# Altium PCB PCB_Internal Battery charger.PcbDoc
Units mm, origin at the board's own origin, x right, y up, seen from the top; angles counter-clockwise.
Board outline 12 x 18 mm, 2 copper layers (Top Layer, Bottom Layer); 22 components, 20 nets, 82 pads, 50 vias.
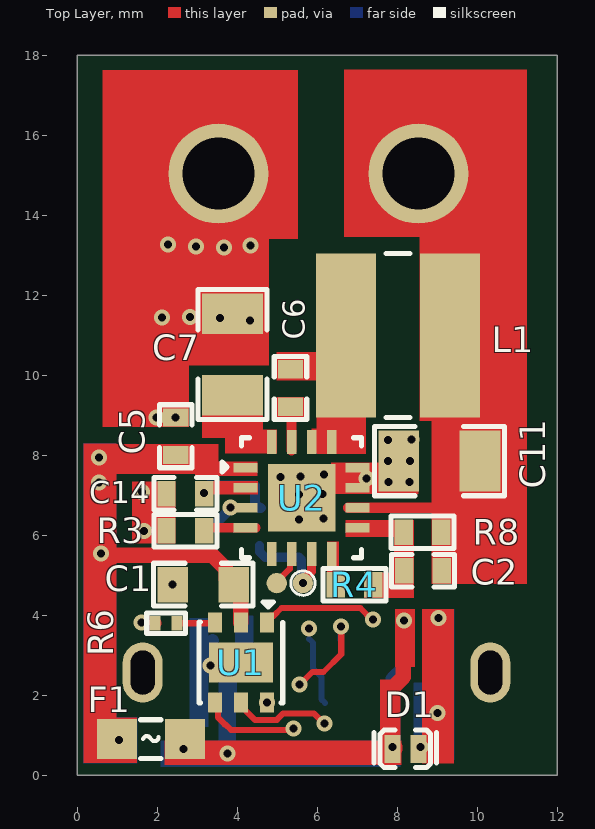
[diagram p0: Top Layer view]
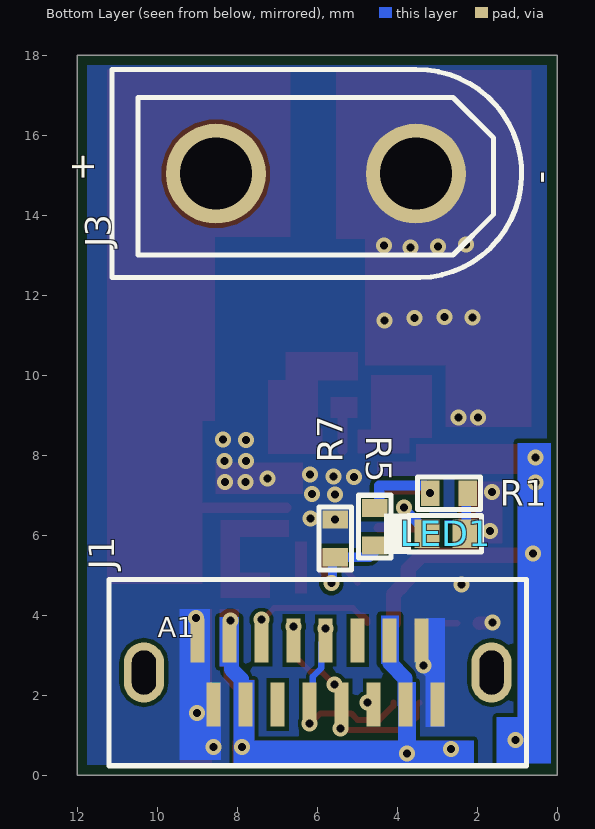
[diagram p1: Bottom Layer view, seen from below]
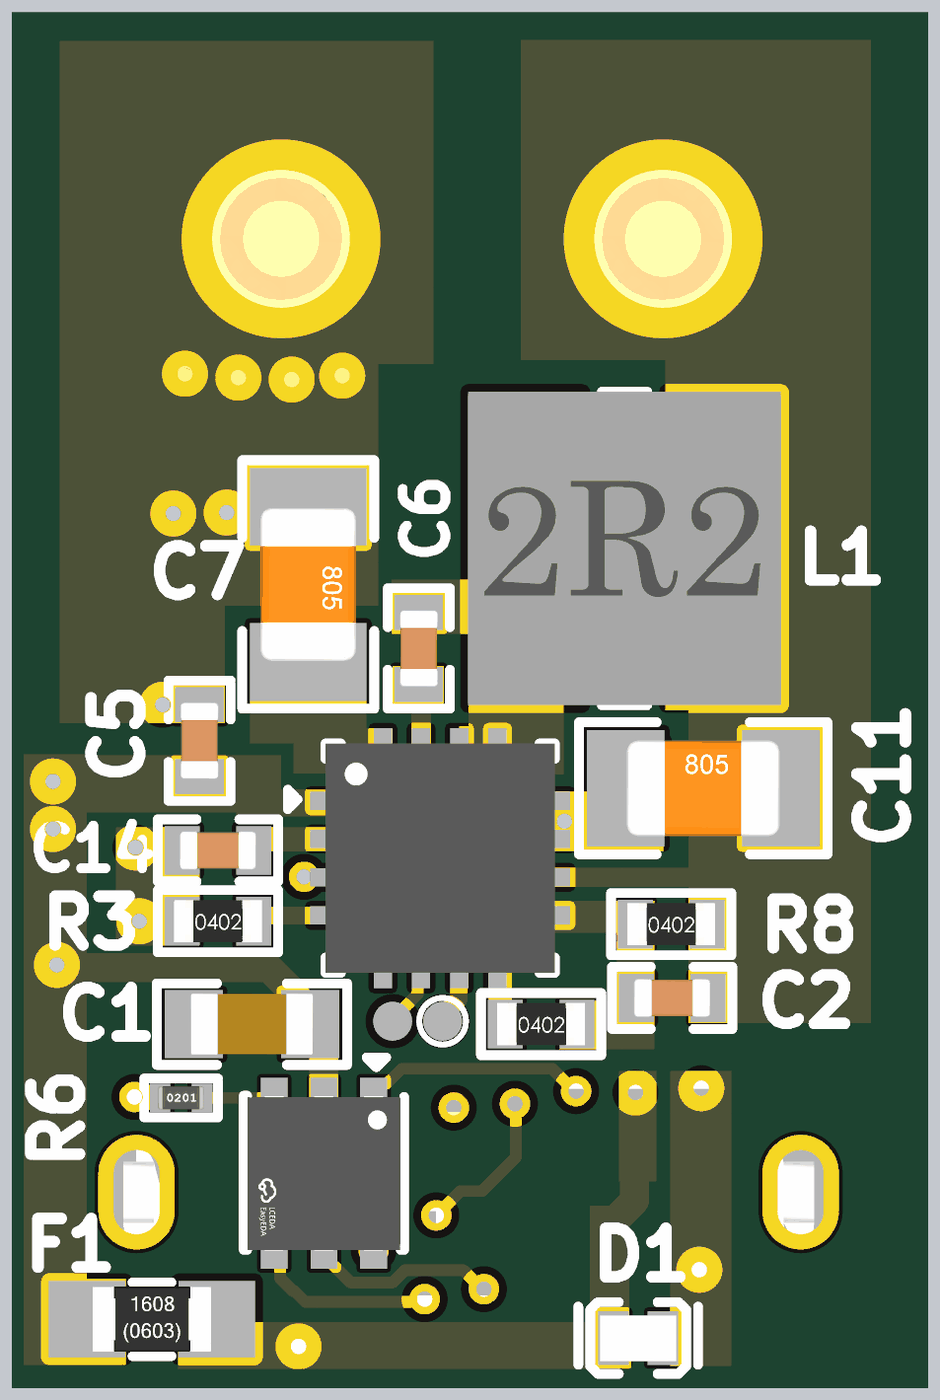
[diagram p2: 3D render of the assembled board from above, using the file's embedded part models]
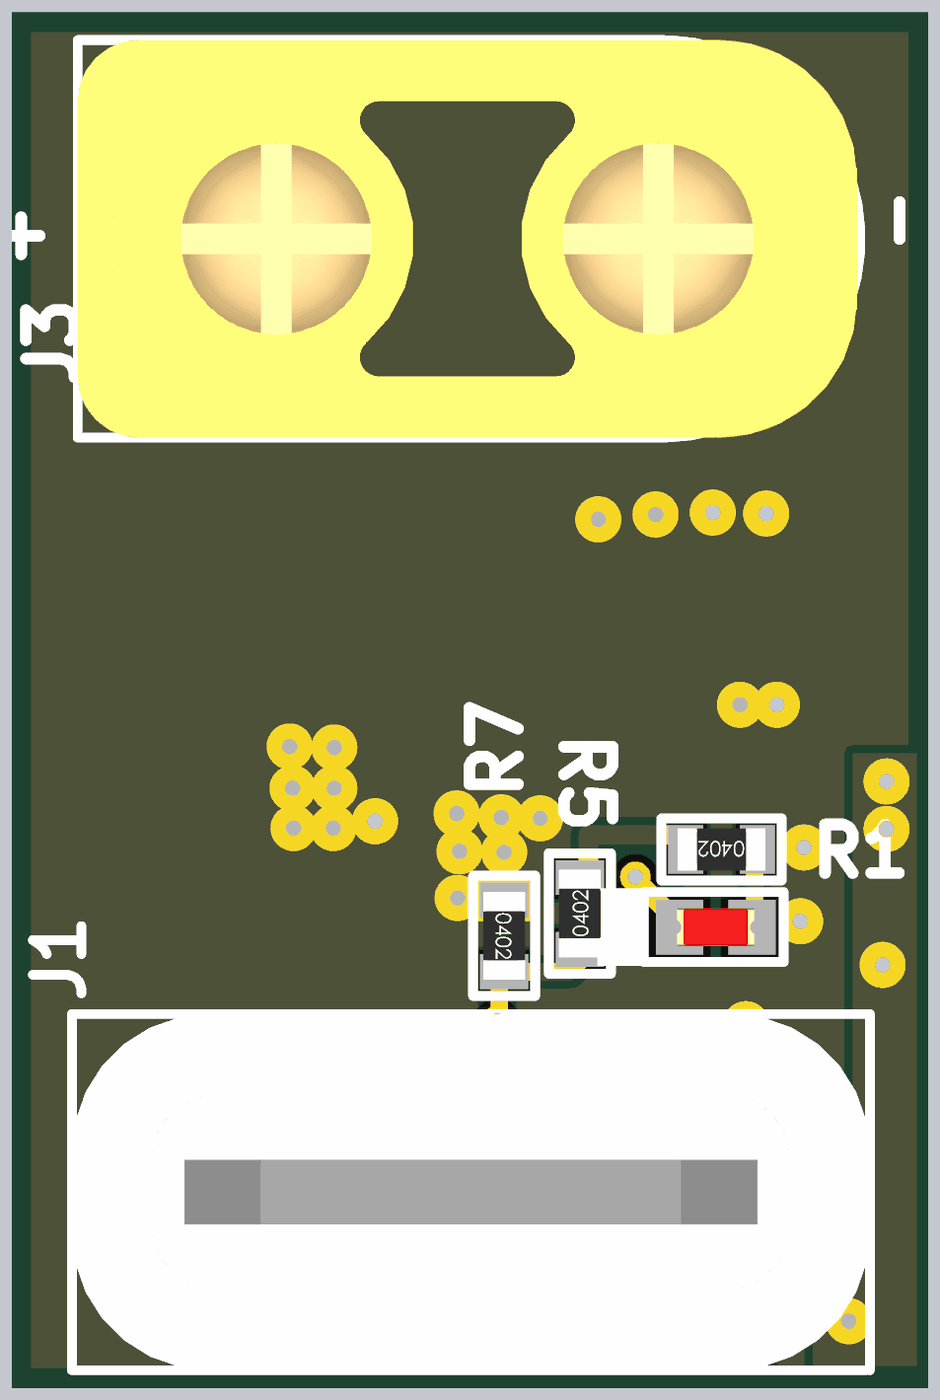
[diagram p3: 3D render of the assembled board from below, using the file's embedded part models]

## Layer stack, top to bottom
Top Solder: solder mask 0.0102, Solder Resist, Dk 3.5
Top Layer: signal copper 0.0356
Dielectric 1: dielectric 0.32, FR-4, Dk 4.8
Bottom Layer: signal copper 0.0356
Bottom Solder: solder mask 0.0102, Solder Resist, Dk 3.5

## Board outline
0,0 0,18 12,18 12,0

## Design rules (kind name [scope] priority, off if disabled: settings)
BoardOutlineClearance [All] p1: gap=0 ignorepadtopadclearanceinfootprint=FALSE except(0.254: Poly-OutlineEdge)
Clearance [All] p1: gap=0.102 ignorepadtopadclearanceinfootprint=FALSE except(0: Arc-Hole Track-Hole SMDPad-Hole THPad-Hole Via-Hole Fill-Hole Poly-Hole Region-Hole Text-Hole; 0.254: Arc-Text Track-Text SMDPad-Text THPad-Text Via-Text Fill-Text Poly-Text Region-Text Text-Text)
MinimumSolderMaskSliver [All] p1: minsoldermaskwidth=0
PolygonConnect [All] p1: connectstyle=Direct reliefconductorwidth=0.254 reliefentries=4 polygonreliefangle="90 Angle" airgapwidth=0.254
RoutingVias [All] p1: holewidth=0.2 width=0.4 viastyle="Through Hole" minholewidth=0.2 minwidth=0.4 maxholewidth=0.2 maxwidth=0.4
SilkToSilkClearance [All] p1: silktosilkclearance=0
SilkToSolderMaskClearance [IsPad] p1: minsilkscreentomaskgap=0 clearancetoexposedcopper=TRUE
SolderMaskExpansion [All] p1: expansion=0.102 istentingtop=FALSE
Width [All] p1: maxlimit=2.54 minlimit=0.102 preferedwidth=0.254 minimp=50.000000 maximp=50.000000 favimp=50.000000
27 further rules are at their usual default settings.

## Components (designator, comment, footprint, x,y, rotation, side; value= is the part's Value field where it differs from the comment)
C1 "10uF" Cap-0603 3.15,4.763 r0 top
C2 "470pF" Cap-0402 8.649,5.105 r0 top
C5 "2.2uf" Cap-0402 2.464,8.471 r270 top
C6 "47nF" Cap-0402 5.334,9.677 r90 top
C7 "10uF" Cap-0805 3.886,10.516 r270 top
C11 "10uF" Cap-0805 9.055,7.849 r0 top
C14 "2.2uF" Cap-0402 2.705,7.036 r180 top
D1 "PESD12VV1BL,315" "DFN1006-2L (Bi-Directional)" 8.204,0.656 r180 top value=25pF
F1 "CF06V2T3R15" Fuse-0603 1.841,0.902 r0 top
J1 "TYPE-C 16PFS LTH6.8 IPX8" "TYPE-C 16PFS LTH6.8 IPX8" 5.985,2.565 r180 bottom locked
J3 "XT30UPB-M" XT30UPB-M 6.031,15.037 r0 bottom locked
L1 "2.2uH" XRTC404030S2R2MGCA 8.026,10.986 r0 top
LED1 "Green" LED-0402 2.781,6.032 r0 bottom
R1 "560R" Res-0402 2.705,7.048 r0 bottom
R3 "20K" Res-0402 2.705,6.109 r0 top
R4 "200K" Res-0402 6.934,4.763 r0 top
R5 "5.23K" Res-0402 4.559,6.21 r90 bottom value=5.23kR
R6 "DNP" Res-0201 2.222,3.797 r0 top
R7 "7.87K" Res-0402 5.55,5.918 r270 bottom value=7.87kR
R8 "1.33M" Res-0402 8.636,6.071 r0 top
U1 "HUSB237-AA001-DN06R" DFN-6L-EP(2x2) 4.092,2.81 r270 top
U2 "BQ25306RTER" "16-WQFN (3x3)" 4.213,7.684 r0 top

## Footprints (in the part's own frame and the unit in brackets; to place one, negate y for a bottom-side part, rotate by r counter-clockwise, add the part's x,y. Pads: shape width x height; smd on the part's side, far side on the other; paste and mask are expansions set on the pad)
"16-WQFN (3x3)" [mm]
  rect 0.6x0.24 smd mask+0.07: 1(0,0) 2(0,-0.5) 3(0,-1) 4(0,-1.5) 9(2.8,-1.5) 10(2.8,-1) 11(2.8,-0.5) 12(2.8,0)
  rect 0.24x0.6 smd mask+0.07: 5(0.65,-2.15) 6(1.15,-2.15) 7(1.65,-2.15) 8(2.15,-2.15) 13(2.15,0.65) 14(1.65,0.65) 15(1.15,0.65) 16(0.65,0.65)
  rect 1.68x1.68 smd mask+0.07: 17(1.4,-0.75)
  silkscreen extent -0.59,-2.25 2.9,0.75, body extent -0.1,-2.25 2.9,0.75, height 0.8
Cap-0402 [mil]
  rect 18x25 smd mask+2.36: 1(-18.5,0) 2(18.5,0)
  silkscreen extent -31,-16 31,16, body extent -20,-10 20,10, height 19
Cap-0603 [mil]
  rect 30x35 smd mask+2.36: 1(-30,0) 2(30,0)
  silkscreen extent -49,-21 49,21, body extent -32,-16 31,16, height 34
Cap-0805 [mil] "SMD 0805"
  rect 40x60 smd mask+2.76: 1(-40,0) 2(40,0)
  silkscreen extent -64,-34 64,34, body extent -39,-25 39,25, height 30
"DFN1006-2L (Bi-Directional)" [mm]
  rect 0.4x0.7 smd paste+0 mask+0.051: 1(-0.325,0) 2(0.325,0)
  silkscreen extent -0.78,-0.47 0.78,0.47, body extent -0.5,-0.3 0.5,0.3, height 0.47
DFN-6L-EP(2x2) [mm]
  rect 0.5x0.35 smd paste+0 mask+0.051: 1(-1,0.65) 2(-1,0) 3(-1,-0.65) 4(1,-0.65) 5(1,0) 6(1,0.65)
  rect 1x1.6 smd paste+0 mask+0.051: 7(0,0)
  silkscreen extent -1.52,-1.05 1,1.05, body extent -1.01,-1 1.01,1, height 0.82
Fuse-0603 [mm]
  rect 1x1 smd: 1(-0.85,0) 2(0.85,0)
  silkscreen extent -0.25,-0.48 0.25,0.48, body extent -0.77,-0.42 0.78,0.43, height 0.45
LED-0402 [mm]
  rect 0.62x0.72 smd: 1(-0.475,0) 2(0.475,0)
  silkscreen extent -0.89,-0.51 1.55,0.51, body extent -0.5,-0.25 0.51,0.25, height 0.45
Res-0201 [mm]
  rect 0.27x0.37 smd mask+0.055: 1(-0.275,0) 2(0.275,0)
  silkscreen extent -0.48,-0.25 0.48,0.25, body extent -0.3,-0.15 0.3,0.15, height 0.29
Res-0402 [mil]
  rect 18x25 smd mask+2.17: 1(-18.5,0) 2(18.5,0)
  silkscreen extent -32,-17 32,16, body extent -23,-11 23,11, height 16
"TYPE-C 16PFS LTH6.8 IPX8" [mm]
  oval 1x1.5 hole 0.6 slot 1.1 at 90 deg paste+0 mask+0.05: 0#(-4.345,0) 1#(4.345,0)
  rect 0.35x1.1 smd paste-100 mask+0.05: A1(-3,0.8) A4(-2.2,0.8) A5(-1.4,0.8) A6(-0.6,0.8) A7(0.2,0.8) A8(1,0.8) A9(1.8,0.8) A12(2.6,0.8) B1(3,-0.8) B4(2.2,-0.8) B5(1.4,-0.8) B6(0.6,-0.8) B7(-0.2,-0.8) B8(-1,-0.8) B9(-1.8,-0.8) B12(-2.6,-0.8)
  silkscreen extent -5.22,-2.33 5.22,2.33, body extent -5.22,-2.33 5.22,2.33, height 9.15
XRTC404030S2R2MGCA [mm]
  rect 1.5x4.1 smd: 1(-1.3,0) 2(1.3,0)
  silkscreen extent -0.3,-2.05 0.3,2.05, body extent -2.05,-2.05 2.05,2.05, height 3
XT30UPB-M [mm]
  round 2.5 hole 1.8 paste+0 mask+0.051: 1(-2.5,0) 2(2.5,0)
  silkscreen extent -5.14,-2.6 5.1,2.6, body extent -5.1,-2.6 5.1,2.6, height 10.7

## Part data
C1: library part GRM188R61E106KA73D, "CAP CER 10UF 25V X5R 0603", Case/Package=0603, LCSC Part Number=C344022, Manufacturer=Murata, Supplier Part Number 1=81-GRM188R61E106KA3D, Category="Ceramic Capacitors", ComponentLink1Description=https://search.murata.co.jp/Ceramy/image/img/A01X/G101/ENG/GRM188R61E106KA73-01.pdf?src-supplier=Digi-Key, ComponentLink1URL=https://search.murata.co.jp/Ceramy/image/img/A01X/G101/ENG/GRM188R61E106KA73-01.pdf?src-supplier=Digi-Key, Manufacturer Part Number=GRM188R61E106KA73D, Pricing 1="1=0.36000, 10=0.25800, 50=0.25800, 100=0.15500, 1000=0.09800, 10000=0.06900 (USD)", RoHS=Yes, RoHS Compliant=Yes, Stock 1=319428, Supplier 1=Mouser
C2: library part GCM155R71H471KA37D, "CAP CER 470PF 50V X7R 0402", Case Code (Imperial)=0402, Case Code (Metric)=1005, Dielectric=X7R, LCSC Part Number=C85859, Manufacturer=Murata, Max Operating Temperature=125°C, Min Operating Temperature=-55°C, Package Quantity=1, Ratings=AEC-Q200, Tolerance=10%, Voltage Rating=50V, Case/Package=0402, ComponentLink1Description=https://datasheet.ciiva.com/131/product-131838.pdf?src-supplier=Digikey, ComponentLink1URL=https://datasheet.ciiva.com/131/product-131838.pdf?src-supplier=Digikey, ComponentLink2Description=https://datasheet.ciiva.com/131/product-131837.pdf?src-supplier=Digikey, ComponentLink2URL=https://datasheet.ciiva.com/131/product-131837.pdf?src-supplier=Digikey, ComponentLink3Description=https://datasheet.ciiva.com/131/product-131839.pdf?src-supplier=Digikey, ComponentLink3URL=https://datasheet.ciiva.com/131/product-131839.pdf?src-supplier=Digikey, ComponentLink4Description=https://datasheet.ciiva.com/11604/product-11604535.pdf?src-supplier=Avnet, ComponentLink4URL=https://datasheet.ciiva.com/11604/product-11604535.pdf?src-supplier=Avnet, Construction=Flat, Depth=0.5mm, Height=0.5mm, Item Type=Capacitors, Length=0.039inch, Manufacturer Part Number=GCM155R71H471KA37D, Material=4241ConductorMaterial, Mounting Technology="Surface Mount", Packaging="Tape and Reel", Pricing="100=0.197, 500=0.175, 5000=0.11 (SEK)", Radiation Hardening=No, RoHS=Yes, RoHS Compliant=Yes, Series=GCM, Stock=7200, Supplier=Rs, Termination=SMD/SMT, Thickness=0.022inch, Voltage Rating (DC)=50V, Width=0.02inch
C5: library part GRM155R61E225KE11D, "CAP CER 2.2UF 25V X5R 0402", Capacitance=2.2uF, Case Code (Imperial)=0402, Case Code (Metric)=1005, Dielectric=X5R, LCSC Part Number=C385032, Manufacturer=Murata, Max Operating Temperature=85°C, Min Operating Temperature=-55°C, Package Quantity=10000, Resistor Type=Ceramic, Tolerance=10%, Voltage Rating=25V, Case/Package=0402, Category="Ceramic Capacitors", ComponentLink1Description=http://www.mouser.com/ds/2/281/c02e-2905.pdf?src-supplier=Mouser, ComponentLink1URL=http://www.mouser.com/ds/2/281/c02e-2905.pdf?src-supplier=Mouser, ComponentLink2Description=http://search.murata.co.jp/Ceramy/image/img/A01X/G101/ENG/GRM155R61E225KE11-01.pdf?src-supplier=Digi-Key, ComponentLink2URL=http://search.murata.co.jp/Ceramy/image/img/A01X/G101/ENG/GRM155R61E225KE11-01.pdf?src-supplier=Digi-Key, ComponentLink3Description=http://search.murata.co.jp/Ceramy/image/img/A01X/partnumbering_e_01.pdf?src-supplier=Digi-Key, ComponentLink3URL=http://search.murata.co.jp/Ceramy/image/img/A01X/partnumbering_e_01.pdf?src-supplier=Digi-Key, ComponentLink4Description=http://psearch.en.murata.com/capacitor/product/GRM155R61E225KE11%23.pdf?src-supplier=Avnet, ComponentLink4URL=http://psearch.en.murata.com/capacitor/product/GRM155R61E225KE11%23.pdf?src-supplier=Avnet, Height=0.5mm, Item Type=Capacitor, Lead Free="Lead Free", Length=1mm, Manufacturer Part Number=GRM155R61E225KE11D, Material=Ceramic, Mount="Surface Mount", Packaging="Tape and Reel", Pricing 1="10000=0.03830, 20000=0.03623, 40000=0.03416, 60000=0.03209, 80000=0.03002, 100000=0.02795, 1000000=0.02588 (USD)", RoHS=Yes, RoHS Compliant=Yes, Stock 1=210000, Supplier 1=Avnet, Supplier Part Number 1=GRM155R61E225KE11D, Termination=SMD/SMT, Thickness=0.022inch, Voltage Rating (DC)=25V, Weight=0.000212oz, Width=0.5mm
C6: library part GRM155R71E473KA88D, "CAP CER 0.047UF 25V X7R 0402", Case Code (Imperial)=0402, Case Code (Metric)=1005, Dielectric=X7R, LCSC Part Number=C77017, Manufacturer=Murata, Max Operating Temperature=125°C, Min Operating Temperature=-55°C, Package Quantity=1, Supplier Part Number 1=2478015P, Tolerance=10%, Voltage=25V, Case/Package=0402, Category="Ceramic Capacitors", ComponentLink1Description=https://datasheet.ciiva.com/34302/1856425-34302854.pdf?src-supplier=Jameco, ComponentLink1URL=https://datasheet.ciiva.com/34302/1856425-34302854.pdf?src-supplier=Jameco, ComponentLink2Description=https://datasheet.ciiva.com/131/grm155r71e473ka88-01-131494.pdf?src-supplier=Digi-Key, ComponentLink2URL=https://datasheet.ciiva.com/131/grm155r71e473ka88-01-131494.pdf?src-supplier=Digi-Key, ComponentLink3Description=https://datasheet.ciiva.com/18184/getdatasheetpartid-153136-18184712.pdf?src-supplier=Verical, ComponentLink3URL=https://datasheet.ciiva.com/18184/getdatasheetpartid-153136-18184712.pdf?src-supplier=Verical, ComponentLink4Description=https://datasheet.ciiva.com/29199/454180-da-01-en-vs-kondensator-0402-29199826.pdf?src-supplier=Conrad, ComponentLink4URL=https://datasheet.ciiva.com/29199/454180-da-01-en-vs-kondensator-0402-29199826.pdf?src-supplier=Conrad, ComponentLink5Description=https://datasheet.ciiva.com/14103/grmseries-highdielectrictype-eng-14103754.pdf?src-supplier=Distrelec, ComponentLink5URL=https://datasheet.ciiva.com/14103/grmseries-highdielectrictype-eng-14103754.pdf?src-supplier=Distrelec, ComponentLink6Description=https://datasheet.ciiva.com/7937/608985-7937623.pdf?src-supplier=Element14, ComponentLink6URL=https://datasheet.ciiva.com/7937/608985-7937623.pdf?src-supplier=Element14, ComponentLink7Description=https://datasheet.ciiva.com/131/grm155r71e473ka88-01-131493.pdf?src-supplier=Digi-Key, ComponentLink7URL=https://datasheet.ciiva.com/131/grm155r71e473ka88-01-131493.pdf?src-supplier=Digi-Key, ComponentLink8Description=https://datasheet.ciiva.com/131/grm155r71e473ka88-01-131492.pdf?src-supplier=Digi-Key, ComponentLink8URL=https://datasheet.ciiva.com/131/grm155r71e473ka88-01-131492.pdf?src-supplier=Digi-Key, ComponentLink9Description=https://datasheet.ciiva.com/5424/product-5424844.pdf?src-supplier=Mouser, ComponentLink9URL=https://datasheet.ciiva.com/5424/product-5424844.pdf?src-supplier=Mouser, ComponentLink10Description=https://datasheet.ciiva.com/2989/product-2989395.pdf?src-supplier=Avnet, ComponentLink10URL=https://datasheet.ciiva.com/2989/product-2989395.pdf?src-supplier=Avnet, ComponentLink11Description=https://datasheet.ciiva.com/16213/product-16213823.pdf?src-supplier=Future+Electronics, ComponentLink11URL=https://datasheet.ciiva.com/16213/product-16213823.pdf?src-supplier=Future+Electronics, Construction=Flat, Depth=0.5mm, Height=0.5mm, Item Type=Capacitor, Lead Free="Lead Free", Length=1mm, Manufacturer Part Number=GRM155R71E473KA88D, Material=Ceramic, Mounting Technology="Surface Mount", Packaging="Tape and Reel", Pins=2, Pricing 1="1000=0.00007, 8000=0.00900 (GBP)", Radiation Hardening=No, Reach SVHC Compliant=Yes, RoHS=Yes, RoHS Compliant=Yes, Series=GRM, Stock 1=10000, Supplier 1=Rs, Termination=SMD/SMT, Thickness=0.022inch, Voltage Rating=25V, Voltage Rating (DC)=25V, Width=0.02inch
C7: library part CC0805KKX5R8BB106, "CAP CER 10UF 25V X5R 0805", Case Code (Imperial)=0805, Case Code (Metric)=2012, Dielectric=X5R, LCSC Part Number=C89831, Manufacturer=Yageo, Max Operating Temperature=85°C, Min Operating Temperature=-55°C, Resistor Type=Ceramic, Supplier Part Number 1=311-1869-1-ND, Tolerance=10%, Voltage Rating=25V, Capacitance=10uF, Case/Package=0805, Category="Ceramic Capacitors", ComponentLink1Description=http://www.mouser.com/ds/2/447/UPY-GPHC_X5R_4V-to-50V_25-1131599.pdf?src-supplier=Mouser, ComponentLink1URL=http://www.mouser.com/ds/2/447/UPY-GPHC_X5R_4V-to-50V_25-1131599.pdf?src-supplier=Mouser, ComponentLink2Description=http://www.yageo.com/documents/recent/UPY-GPHC_X5R_4V-to-50V_25.pdf?src-supplier=Digi-Key, ComponentLink2URL=http://www.yageo.com/documents/recent/UPY-GPHC_X5R_4V-to-50V_25.pdf?src-supplier=Digi-Key, Depth=1.25mm, Halogen Free="Halogen Free", Item Type=Capacitor, Lead Free="Lead Free", Length=0.079inch, Manufacturer Part Number=CC0805KKX5R8BB106, Mount="Surface Mount", Packaging="Tape and Reel", Pricing 1="1=0.31000, 10=0.21200, 50=0.14820, 100=0.12710, 500=0.09534, 1000=0.08050 (USD)", RoHS=Yes, RoHS Compliant=Yes, Series=CC, Stock 1=554290, Supplier 1=Digi-Key, Termination=SMD/SMT, Thickness=0.057inch, Voltage Rating (DC)=25V, Weight=0.000194oz, Width=0.049inch
C11: library part EMK212BB7106MG-T, "CAP CER 10UF 16V X7R 0805", Case Code (Imperial)=0805, Case Code (Metric)=2012, Dielectric=X7R, LCSC Part Number=C141287, Manufacturer="Taiyo Yuden", Max Operating Temperature=125°C, Min Operating Temperature=-55°C, Package Quantity=3000, Ratings=AEC-Q200, Resistor Type=Ceramic, Supplier Part Number 1=587-3319-1-ND, Tolerance=20%, Voltage Rating=16V, Capacitance=10uF, Case/Package=0805, Category="Ceramic Capacitors", ComponentLink1Description=https://datasheet.ciiva.com/24393/472emk212bb7106mg-t-24393497.pdf?src-supplier=Onlinecomponents.com, ComponentLink1URL=https://datasheet.ciiva.com/24393/472emk212bb7106mg-t-24393497.pdf?src-supplier=Onlinecomponents.com, ComponentLink2Description=https://datasheet.ciiva.com/30229/379emk212bb7106mg-t-30229719.pdf?src-supplier=Onlinecomponents.com, ComponentLink2URL=https://datasheet.ciiva.com/30229/379emk212bb7106mg-t-30229719.pdf?src-supplier=Onlinecomponents.com, ComponentLink3Description=https://datasheet.ciiva.com/18697/mlcc-all-e-18697736.pdf?src-supplier=Digi-Key, ComponentLink3URL=https://datasheet.ciiva.com/18697/mlcc-all-e-18697736.pdf?src-supplier=Digi-Key, ComponentLink4Description=https://datasheet.ciiva.com/18697/mlcc-all-e-18697735.pdf?src-supplier=Digi-Key, ComponentLink4URL=https://datasheet.ciiva.com/18697/mlcc-all-e-18697735.pdf?src-supplier=Digi-Key, ComponentLink5Description=https://datasheet.ciiva.com/18697/mlcc-all-e-18697737.pdf?src-supplier=Digi-Key, ComponentLink5URL=https://datasheet.ciiva.com/18697/mlcc-all-e-18697737.pdf?src-supplier=Digi-Key, ComponentLink6Description=https://datasheet.ciiva.com/15376/mlcc01-e-15376088.pdf?src-supplier=Mouser, ComponentLink6URL=https://datasheet.ciiva.com/15376/mlcc01-e-15376088.pdf?src-supplier=Mouser, Halogen Free="Halogen Free", Height=1.25mm, Item Type=Capacitor, Length=2mm, Manufacturer Part Number=EMK212BB7106MG-T, Mount="Surface Mount", Packaging="Tape and Reel", Pricing 1="1=0.40000, 10=0.28000, 50=0.19620, 100=0.16820, 500=0.12612, 1000=0.10650 (USD)", RoHS=Yes, RoHS Compliant=Yes, Stock 1=896107, Supplier 1=Digi-Key, Termination=SMD/SMT, Thickness=0.053inch, Voltage Rating (DC)=16V, Width=0.049inch
C14: library part GRM155R61C225KE11D, "CAP CER 2.2UF 16V X5R 0402", Case Code (Imperial)=0402, Case Code (Metric)=1005, LCSC Part Number=C88944, Manufacturer=Murata, Max Operating Temperature=85°C, Min Operating Temperature=-55°C, Tolerance=10%, Voltage Rating=16V, Case/Package=0402, ComponentLink1Description=http://www.mouser.com/ds/2/281/c02e-2905.pdf?src-supplier=Mouser, ComponentLink1URL=http://www.mouser.com/ds/2/281/c02e-2905.pdf?src-supplier=Mouser, ComponentLink2Description=https://datasheet.octopart.com/GRM155R61C225KE11D-Murata-datasheet-149522998.pdf?src-supplier=Newark, ComponentLink2URL=https://datasheet.octopart.com/GRM155R61C225KE11D-Murata-datasheet-149522998.pdf?src-supplier=Newark, ComponentLink3Description=https://datasheet.octopart.com/GRM155R61C225KE11D-Murata-datasheet-66001083.pdf?src-supplier=Future+Electronics, ComponentLink3URL=https://datasheet.octopart.com/GRM155R61C225KE11D-Murata-datasheet-66001083.pdf?src-supplier=Future+Electronics, ComponentLink4Description=https://search.murata.co.jp/Ceramy/image/img/A01X/G101/ENG/GRM155R61C225KE11-01.pdf?src-supplier=Digikey, ComponentLink4URL=https://search.murata.co.jp/Ceramy/image/img/A01X/G101/ENG/GRM155R61C225KE11-01.pdf?src-supplier=Digikey, ComponentLink5Description=https://datasheet.octopart.com/GRM155R61C225KE11D-Murata-datasheet-165579666.pdf?src-supplier=TME, ComponentLink5URL=https://datasheet.octopart.com/GRM155R61C225KE11D-Murata-datasheet-165579666.pdf?src-supplier=TME, Height=0.3mm, Item Type=Capacitors, Lead Free="Lead Free", Length=0.039inch, Manufacturer Part Number=GRM155R61C225KE11D, Material=Ceramic, Mounting Technology="Surface Mount", Packaging="Cut Tape", Pricing="10000=0.0294, 20000=0.0289, 30000=0.0287, 40000=0.0285, 50000=0.0279 (USD)", RoHS=Yes, RoHS Compliant=Yes, Series=GRM, Stock=80000, Supplier="Future Electronics", Thickness=0.022inch, Voltage Rating (DC)=16V, Width=0.02inch
D1: "TVS DIODE 12VWM 38VC DFN1006-2", Breakdown Voltage=14.6V, Case/Package=111Case, Clamping Voltage=38V, LCSC Part Number=C111472, Leakage Current=10nA, Manufacturer=Nexperia, Max Operating Temperature=150°C, Max Power Dissipation=290W, Min Operating Temperature=-55°C, Peak Pulse Current=7.8A, Power Line Protection=5898YesNo, Reverse Standoff Voltage=12V, ComponentLink1Description=http://www.farnell.com/datasheets/2178732.pdf?src-supplier=Farnell, ComponentLink1URL=http://www.farnell.com/datasheets/2178732.pdf?src-supplier=Farnell, ComponentLink2Description=https://assets.nexperia.com/documents/data-sheet/PESD12VV1BL.pdf?src-supplier=Digikey, ComponentLink2URL=https://assets.nexperia.com/documents/data-sheet/PESD12VV1BL.pdf?src-supplier=Digikey, Depth=620um, Direction=211Direction, Element Configuration=5460ElementConfiguration, Item Type=Diode, Length=1.02mm, Manufacturer Part Number=PESD12VV1BL,315, Min Breakdown Voltage=14.6V, Mounting Technology=8Mount, Number of Bidirectional Channels=1NUMBER, Number of Channels=1NUMBER, Peak Pulse Power=290W, Pins=2NUMBER, Polarity=211Direction, Pricing="10000=0.029, 30000=0.028, 40000=0.0277, 100000=0.0269, 150000=0.0261 (USD)", Radiation Hardening=5898YesNo, RoHS=Yes, Stock=70000, Supplier="Future Electronics", Termination=4890ConnectorType, Working Voltage=12V
F1: "50A SMD Fuse 3.15A 24V 0603 Disposable fuses ROHS", LCSC Part Number=C163108, Manufacturer="TA-I Tech", Package=0603, ComponentLink1Description=LCSC, ComponentLink1URL=https://www.lcsc.com/product-detail/Disposable-fuses_TA-I-Tech-CF06V2T3R15_C163108.html, Item Type=Fuses, Manufacturer Part Number=CF06V2T3R15
J1: "USB 3.1 3A 1 Standing paste 16P Mother -35℃~+85℃ Type-C SMD USB Connectors ROHS", LCSC Part Number=C3020049, Manufacturer="SHOU HAN", Package=SMD, ComponentLink1Description=LCSC, ComponentLink1URL=https://www.lcsc.com/product-detail/USB-Connectors_SHOU-HAN-TYPE-C-16PFS-LTH6-8-IPX8_C3020049.html, Item Type="USB Connector", Manufacturer Part Number="TYPE-C 16PFS LTH6.8 IPX8"
J3: "Plug", LCSC Part Number=C428721, Manufacturer="Changzhou Amass Elec", Package=-, ComponentLink1Description=LCSC, ComponentLink1URL=https://www.lcsc.com/product-detail/plug_Changzhou-Amass-Elec-XT30UPB-M_C428721.html, Item Type=Plug, Manufacturer Part Number=XT30UPB-M
L1: library part XRTC404030S2R2MGCA, "9A 2.2uH ±20% 10.5A SMD,4x4mm Power Inductors ROHS  IR 19/22mOhm", LCSC Part Number=C39846868, Manufacturer=XR, Package=SMD,4x4mm, ComponentLink1Description=LCSC, ComponentLink1URL=https://www.lcsc.com/product-detail/Power-Inductors_XR-XRTC404030S2R2MGCA_C39846868.html, Item Type=Inductors, Manufacturer Part Number=XRTC404030S2R2MGCA
LED1: library part 16-213/GHC-YR1S1/3T, "Green 520~535nm 0402 Light Emitting Diodes (LED) RoHS", LCSC Part Number=C74338, Manufacturer="Everlight Elec", Package=0402, ComponentLink1Description=LCSC, ComponentLink1URL=https://www.lcsc.com/product-detail/Light-Emitting-Diodes-LED_Everlight-Elec-16-213-GHC-YR1S1-3T_C74338.html, Dominant Wavelength / Coordinate rank=520~535nm, Illumination Color=Green, Item Type=LED, Luminous Intensity (IF=20mA)=112~285mcd, Manufacturer Part Number=16-213/GHC-YR1S1/3T, Mounting Type="Surface Mount"
R1: library part RC0402FR-07560RL, "RES 560 OHM 1% 1/16W 0402", Case Code (Imperial)=0402, Case Code (Metric)=1005, LCSC Part Number=C163460, Manufacturer=Yageo, Max Operating Temperature=155°C, Max Power Dissipation=63mW, Min Operating Temperature=-55°C, Package Quantity=1, Resistance Tolerance=1%, Resistor Type="Thick Film", Supplier Part Number=8872046, Temperature Coefficient=100ppm/°C, Voltage Rating=50V, Case/Package=0402, Category="Chip SMD Resistors", ComponentLink1Description=https://datasheet.ciiva.com/2453/pyu-r-int-thick-7-2453458.pdf?src-supplier=Digikey, ComponentLink1URL=https://datasheet.ciiva.com/2453/pyu-r-int-thick-7-2453458.pdf?src-supplier=Digikey, ComponentLink2Description=https://datasheet.ciiva.com/2453/pyu-r-int-thick-7-2453459.pdf?src-supplier=Digikey, ComponentLink2URL=https://datasheet.ciiva.com/2453/pyu-r-int-thick-7-2453459.pdf?src-supplier=Digikey, ComponentLink3Description=https://datasheet.ciiva.com/2453/pyu-r-int-thick-7-2453457.pdf?src-supplier=Digikey, ComponentLink3URL=https://datasheet.ciiva.com/2453/pyu-r-int-thick-7-2453457.pdf?src-supplier=Digikey, ComponentLink4Description=https://datasheet.ciiva.com/12558/pyu-rc0402-51-rohs-l-6-r-8721-12558383.pdf?src-supplier=Mouser, ComponentLink4URL=https://datasheet.ciiva.com/12558/pyu-rc0402-51-rohs-l-6-r-8721-12558383.pdf?src-supplier=Mouser, ComponentLink5Description=https://datasheet.ciiva.com/7850/1018594-7850042.pdf?src-supplier=Element14, ComponentLink5URL=https://datasheet.ciiva.com/7850/1018594-7850042.pdf?src-supplier=Element14, ComponentLink6Description=https://datasheet.ciiva.com/7850/1018594-7850043.pdf?src-supplier=Element14, ComponentLink6URL=https://datasheet.ciiva.com/7850/1018594-7850043.pdf?src-supplier=Element14, Construction=Rectangular, Depth=0.5mm, Features="Moisture Resistant", Height=0.016inch, Item Type=Resistor, Lead Free="Lead Free", Length=1mm, Manufacturer Part Number=RC0402FR-07560RL, Military Standard=Not, Number of Terminations=2, Packaging="Tape and Reel", Power Rating=63mW, Pricing="10000=0.0012, 100000=0.0011, 300000=0.0011, 1250000=0.001, 3000000=0.0009 (USD)", Reach SVHC Compliant=Unknown, RoHS=Yes, RoHS Compliant=Yes, Series=RC, Stock=1360000, Supplier="Future Electronics", Termination=SMD/SMT, Tolerance=1%, Width=0.02inch
R3: library part RC0402FR-0720KL, "RES 20K OHM 1% 1/16W 0402", Case Code (Imperial)=0402, Case Code (Metric)=1005, LCSC Part Number=C93942, Manufacturer=Yageo, Max Operating Temperature=155°C, Max Power Dissipation=63mW, Min Operating Temperature=-55°C, Package Quantity=1, Power Rating=62.5mW, Resistance=20kR, Resistance Tolerance=1%, Resistor Type="Thick Film", Temperature Coefficient=100ppm/°C, Voltage Rating=50V, Case/Package=0402, Category="Chip SMD Resistors", ComponentLink1Description=https://datasheet.ciiva.com/11808/0900766b80c66297-11808454.pdf?src-supplier=RSComponents, ComponentLink1URL=https://datasheet.ciiva.com/11808/0900766b80c66297-11808454.pdf?src-supplier=RSComponents, ComponentLink2Description=https://datasheet.ciiva.com/7983/1018594-7983511.pdf?src-supplier=Element14, ComponentLink2URL=https://datasheet.ciiva.com/7983/1018594-7983511.pdf?src-supplier=Element14, ComponentLink3Description=https://datasheet.ciiva.com/46394/1018594-46394974.pdf?src-supplier=Element14, ComponentLink3URL=https://datasheet.ciiva.com/46394/1018594-46394974.pdf?src-supplier=Element14, ComponentLink4Description=https://datasheet.ciiva.com/2453/pyu-r-int-thick-7-2453494.pdf?src-supplier=Digi-Key, ComponentLink4URL=https://datasheet.ciiva.com/2453/pyu-r-int-thick-7-2453494.pdf?src-supplier=Digi-Key, ComponentLink5Description=https://datasheet.ciiva.com/2453/pyu-r-int-thick-7-2453495.pdf?src-supplier=Digi-Key, ComponentLink5URL=https://datasheet.ciiva.com/2453/pyu-r-int-thick-7-2453495.pdf?src-supplier=Digi-Key, ComponentLink6Description=https://datasheet.ciiva.com/2453/pyu-r-int-thick-7-2453493.pdf?src-supplier=Digi-Key, ComponentLink6URL=https://datasheet.ciiva.com/2453/pyu-r-int-thick-7-2453493.pdf?src-supplier=Digi-Key, ComponentLink7Description=https://datasheet.ciiva.com/12558/pyu-rc0402-51-rohs-l-6-r-8721-12558796.pdf?src-supplier=Mouser, ComponentLink7URL=https://datasheet.ciiva.com/12558/pyu-rc0402-51-rohs-l-6-r-8721-12558796.pdf?src-supplier=Mouser, Construction=Rectangular, Depth=0.5mm, Features="Moisture Resistant", Height=0.016inch, Item Type=Resistor, Lead Free="Lead Free", Length=1mm, Manufacturer Part Number=RC0402FR-0720KL, Military Standard=Not, Number of Pins=2, Number of Terminations=2, Packaging="Tape and Reel", Pricing 1="10000=0.00085 (USD)", Reach SVHC Compliant=Yes, RoHS=Yes, RoHS Compliant=Yes, Series=RC, Size Code=0402, Stock 1=1960708, Supplier 1=Avnet, Supplier Part Number 1=RC0402FR-0720KL, Technology="THICK FILM", Termination=SMD/SMT, Tolerance=1%, Voltage Rating (DC)=50V, Width=0.02inch
R4: library part RC0402DR-07200KL, "RES 200K OHM 0.5% 1/16W 0402", Case/Package=0402, LCSC Part Number=C138077, Manufacturer=Yageo, Max Operating Temperature=155°C, Max Power Dissipation=63mW, Min Operating Temperature=-55°C, Resistance=200kR, Resistor Type="Thick Film", Supplier Part Number 1=603-RC0402DR-07200KL, Temperature Coefficient=100ppm/°C, Tolerance=0.5%, Category="Chip SMD Resistors", ComponentLink1Description=http://www.yageo.com.tw/exep/pages/download/literatures/PYu-R_INT-thick_7.pdf?src-supplier=Digi-Key, ComponentLink1URL=http://www.yageo.com.tw/exep/pages/download/literatures/PYu-R_INT-thick_7.pdf?src-supplier=Digi-Key, Features="Moisture Resistant", Height=0.016inch, Length=0.039inch, Manufacturer Part Number=RC0402DR-07200KL, Number of Terminations=2, Packaging="Tape and Reel", Pricing 1="1=0.13000, 10=0.07000, 50=0.07000, 100=0.02900, 1000=0.01300, 10000=0.00700 (USD)", RoHS=Yes, Supplier 1=Mouser, Width=0.02inch
R5: library part CRCW04025K23FKED, "RES SMD 5.23K OHM 1% 1/16W 0402", Case Code (Imperial)=0402, Case Code (Metric)=1005, LCSC Part Number=C2076550, Manufacturer=Vishay, Max Operating Temperature=155°C, Max Power Dissipation=63mW, Min Operating Temperature=-55°C, Package Quantity=10, Resistance Tolerance=1%, Resistor Type="Thick Film", Temperature Coefficient=100ppm/°C, Voltage Rating=50V, Case/Package=0402, ComponentLink1Description=https://datasheet.ciiva.com/7679/1697337-7679068.pdf?src-supplier=Element14, ComponentLink1URL=https://datasheet.ciiva.com/7679/1697337-7679068.pdf?src-supplier=Element14, ComponentLink2Description=https://datasheet.ciiva.com/22702/1697337-22702815.pdf?src-supplier=Element14, ComponentLink2URL=https://datasheet.ciiva.com/22702/1697337-22702815.pdf?src-supplier=Element14, ComponentLink3Description=https://datasheet.ciiva.com/2463/dcrcwe3-2463422.pdf?src-supplier=Digikey, ComponentLink3URL=https://datasheet.ciiva.com/2463/dcrcwe3-2463422.pdf?src-supplier=Digikey, ComponentLink4Description=https://datasheet.ciiva.com/6051/125364-6051350.pdf?src-supplier=Farnell, ComponentLink4URL=https://datasheet.ciiva.com/6051/125364-6051350.pdf?src-supplier=Farnell, ComponentLink5Description=https://datasheet.ciiva.com/7743/125364-7743706.pdf?src-supplier=Element14, ComponentLink5URL=https://datasheet.ciiva.com/7743/125364-7743706.pdf?src-supplier=Element14, ComponentLink6Description=https://datasheet.ciiva.com/7679/1697337-7679069.pdf?src-supplier=Element14, ComponentLink6URL=https://datasheet.ciiva.com/7679/1697337-7679069.pdf?src-supplier=Element14, ComponentLink7Description=https://datasheet.ciiva.com/2463/dcrcwe3-2463423.pdf?src-supplier=Digikey, ComponentLink7URL=https://datasheet.ciiva.com/2463/dcrcwe3-2463423.pdf?src-supplier=Digikey, ComponentLink8Description=https://datasheet.ciiva.com/2463/dcrcwe3-2463421.pdf?src-supplier=Digikey, ComponentLink8URL=https://datasheet.ciiva.com/2463/dcrcwe3-2463421.pdf?src-supplier=Digikey, ComponentLink9Description=https://datasheet.ciiva.com/16767/70201119-16767021.pdf?src-supplier=Allied+Electronics, ComponentLink9URL=https://datasheet.ciiva.com/16767/70201119-16767021.pdf?src-supplier=Allied+Electronics, ComponentLink10Description=https://datasheet.ciiva.com/22869/70201119-22869546.pdf?src-supplier=Allied+Electronics, ComponentLink10URL=https://datasheet.ciiva.com/22869/70201119-22869546.pdf?src-supplier=Allied+Electronics, ComponentLink11Description=https://datasheet.ciiva.com/3256/dcrcwe3-3256686.pdf?src-supplier=Avnet, ComponentLink11URL=https://datasheet.ciiva.com/3256/dcrcwe3-3256686.pdf?src-supplier=Avnet, ComponentLink12Description=https://datasheet.ciiva.com/16200/dcrcwe3-16200567.pdf?src-supplier=Future+Electronics, ComponentLink12URL=https://datasheet.ciiva.com/16200/dcrcwe3-16200567.pdf?src-supplier=Future+Electronics, Contact Plating=Tin, Depth=0.5mm, Features="Automotive AEC-Q200", Height=0.35mm, Item Type=Resistors, Lead Free=5697LeadFree, Length=1mm, Manufacturer Part Number=CRCW04025K23FKED, Number of Terminations=2, Packaging="Tape and Reel", Pins=2, Power Rating=63mW, Pricing="20000=0.00245 (USD)", Radiation Hardening=No, Reach SVHC Compliant=Unknown, RoHS=Yes, RoHS Compliant=Yes, Series=CRCW, Stock=10000, Supplier=Avnet, Technology="THICK FILM", Termination=SMD/SMT, Tolerance=1%, Voltage Rating (DC)=50V, Weight=2.3E-05oz, Width=0.02inch, Working Voltage=50V
R6: library part 0201WMF7502TEE, "50mW Thick Film Resistors 25V ±1% ±200ppm/℃ 75kΩ 0201 Chip Resistor - Surface Mount ROHS", LCSC Part Number=C270339, Manufacturer=UNI-ROYAL, Package=0201, ComponentLink1Description=LCSC, ComponentLink1URL=https://www.lcsc.com/product-detail/Chip-Resistor-Surface-Mount_UNI-ROYAL-Uniroyal-Elec-0201WMF7502TEE_C270339.html, Item Type=Resistor, Manufacturer Part Number=0201WMF7502TEE
R7: library part RT0402BRD077K87L, "RES SMD 7.87KOHM 0.1% 1/16W 0402", Case Code (Imperial)=0402, Case Code (Metric)=1005, LCSC Part Number=C852920, Manufacturer=Yageo, Max Operating Temperature=155°C, Max Power Dissipation=63mW, Min Operating Temperature=-55°C, Package Quantity=10000, Power Rating=62.5mW, Temperature Coefficient=25ppm/°C, Tolerance=0.1%, Voltage Rating=50V, Case/Package=0402, ComponentLink1Description=https://datasheet.ciiva.com/2582/pyu-rt-1-to-0-05-rohs-l-4-2582499.pdf?src-supplier=Digikey, ComponentLink1URL=https://datasheet.ciiva.com/2582/pyu-rt-1-to-0-05-rohs-l-4-2582499.pdf?src-supplier=Digikey, ComponentLink2Description=https://datasheet.ciiva.com/12796/pyu-rt-1-to-0-05-rohs-l-4-12796502.pdf?src-supplier=Mouser, ComponentLink2URL=https://datasheet.ciiva.com/12796/pyu-rt-1-to-0-05-rohs-l-4-12796502.pdf?src-supplier=Mouser, ComponentLink3Description=https://datasheet.ciiva.com/46635/pyu-rt-1-to-0-05-rohs-l-5-46635069.pdf?src-supplier=Digikey, ComponentLink3URL=https://datasheet.ciiva.com/46635/pyu-rt-1-to-0-05-rohs-l-5-46635069.pdf?src-supplier=Digikey, Features="Moisture Resistant", Height=0.014inch, Item Type=Resistors, Lead Free="Lead Free", Length=0.039inch, Manufacturer Part Number=RT0402BRD077K87L, Number of Terminations=2, Packaging="Tape and Reel", Pricing="10=1.13, 100=0.981, 500=0.57, 2500=0.512, 5000=0.454, 10000=0.411, 50000=0.403, 100000=0.394 (SEK)", RoHS=Yes, RoHS Compliant=Yes, Series=RT, Stock=16247, Supplier=Farnell, Termination=SMD/SMT, Voltage Rating (DC)=50V, Weight=2.3E-05oz, Width=0.5mm
R8: library part FRC0402F1334TS, "62.5mW Thick Film Resistors 50V ±100ppm/℃ ±1% 1.33MΩ 0402 Chip Resistor - Surface Mount ROHS", LCSC Part Number=C5713265, Manufacturer=FOJAN, Package=0402, ComponentLink1Description=LCSC, ComponentLink1URL=https://www.lcsc.com/product-detail/Chip-Resistor-Surface-Mount_FOJAN-FRC0402F1334TS_C5713265.html, Item Type=Resistor, Manufacturer Part Number=FRC0402F1334TS
U1: "DFN-6L-EP(2x2) USB PD ROHS", LCSC Part Number=C22373734, Manufacturer=Hynetek, Package=DFN-6L-EP(2x2), ComponentLink1Description=LCSC, ComponentLink1URL=https://www.lcsc.com/product-detail/USB-PD_Hynetek-HUSB237-AA001-DN06R_C22373734.html, Item Type=IC, Manufacturer Part Number=HUSB237-AA001-DN06R
U2: "STANDALONE 17-V, 3-A SINGLE CELL", LCSC Part Number=C3682611, Manufacturer="Texas Instruments", Item Type=IC, Manufacturer Part Number=BQ25306RTER, Pricing="1=2.27, 10=1.48, 50=1.48, 100=1.21, 1000=1.11, 10000=0.937 (USD)", RoHS=Yes, Stock=4465, Supplier=Mouser

## Free pads (board coordinates)
  round 0.508 smd: 18(5.645,4.801) 19(4.991,4.801)

## Via types
v1: diameter 0.4, hole 0.2, Top Layer to Bottom Layer, 50 vias

## Nets (pads, with @x,y where several pads share a name; then routed paths per layer and width w, separated by ;. In a path a pad name is that pad's centre, name@x,y a point inside that pad or via, vN(x,y) a via of type N, cw(c..) or ccw(c..) an arc to the next point about the centre after c; other vN are vias at no path point)
BAT: C2.2 C11.2 J3.2 L1.2 R8.2 U2.10 | length 4.9
  Top Layer w0.254: U2.10@6.769,6.684 U2.10 9.246,6.684 ; R8.2@9.246,6.158 9.246,6.684 ; C11.2 9.922,7.7 9.922,6.684 9.246,6.684
CC1: J1.A5 U1.1 | length 3
  Top Layer w0.152: U1.1 4.742,3.885 4.84,3.984 4.915,3.984 5.11,4.178 7.077,4.178 7.369,3.886 v1(7.391,3.886)
CC2: J1.B5 U1.6
  other v1: 4.742,1.81
DM: J1.A7 J1.B7 U1.5 | length 4.2
  Top Layer w0.152: U1.5 4.092,1.735 4.444,1.382 4.99,1.382 5.151,1.543 5.915,1.543 6.163,1.295 v1(6.185,1.295)
  Bottom Layer w0.152: J1.A7@5.798,3.403 5.897,3.305 5.897,2.676 6.109,2.464 6.109,1.892 J1.B7@6.198,1.803
  other v1: 5.791,3.67
DP: J1.A6 J1.B6 U1.4 | length 4.9
  Top Layer w0.152: U1.4 3.518,1.734 3.518,1.442 3.69,1.27 3.708,1.27 3.85,1.128 5.373,1.128 v1(5.41,1.165) ; v1(5.563,2.261) 5.88,2.578 6.159,2.578 6.604,3.023 6.604,3.708 v1(6.591,3.721)
  Bottom Layer w0.152: J1.A6 6.585,3.715 v1(6.591,3.721)
EN: pad.19 U2.6 | length 0.9
  Top Layer w0.152: pad.19 4.991,4.826 5.32,5.155 5.32,5.49 U2.6
FB_GND: R4.1 U2.8
GND: C1.1 C5.1 C7.1 C11.1 C14.2 D1.1 J1.A1 J1.A12 J1.B1 J1.B12 J3.1 R3.1 R6.1 R7.1 U1.7 U2.11 U2.12 U2.17 | length 5
  Top Layer w0.33: v1(1.613,3.81) 1.619,3.804 1.941,3.804 R6.1 ; v1(1.626,7.074) 1.639,7.061 2.172,7.061 2.209,7.023 C14.2@2.235,7.023 ; v1(1.676,6.109) 1.683,6.102 2.229,6.102 R3.1@2.235,6.096
  Bottom Layer w0.33: J1.B1 2.995,1.775 2.995,2.398 v1(3.34,2.743) 3.34,2.762 3.375,2.797 3.375,3.355 J1.A12 ; J1.B12 8.585,1.559 8.595,1.549 v1(9.004,1.549) 8.991,1.536 8.991,1.118 8.59,0.717 v1(8.59,0.699)
  other v1: 9.03,3.924 2.388,4.763 5.55,6.388 6.159,6.413 5.55,7.01 6.134,7.023 7.785,7.328 8.306,7.328 7.239,7.417 5.08,7.455 5.588,7.468 6.172,7.518 7.772,7.849 8.319,7.849 7.772,8.382 8.357,8.395 1.981,8.941 2.464,8.941 4.318,11.367 3.569,11.43 2.121,11.443 2.819,11.455 3.67,13.195 2.972,13.221 4.331,13.246 2.273,13.271
IND_SW: C6.2 L1.1 U2.13 U2.14
NetC6_1: C6.1 U2.15 | length 1.1
  Top Layer w0.254: C6.1 5.363,9.178 U2.15 U2.15@5.363,8.115
NetC7_2: C7.2 U2.16
NetLED1_1: LED1.1 R1.1 | length 1
  Bottom Layer w0.229: R1.1 2.271,7.013 2.271,6.068 LED1.1
NetR3_2: R3.2 U2.4 | length 1.3
  Top Layer w0.229: R3.2@3.188,6.096 3.276,6.184 U2.4 U2.4@4.47,6.184
NetR6_2: R6.2 U1.3 | length 1
  Top Layer w0.152: R6.2 3.467,3.797 U1.3@3.492,3.772
REGN: C14.1 R1.2 R5.2 U2.2 | length 2.1
  Bottom Layer w0.254: v1(3.175,7.048) 3.175,7.137 3.277,7.239 4.449,7.239 4.449,6.782 4.55,6.68 R5.2@4.597,6.68
STAT: LED1.2 U2.3 | length 0.9
  Bottom Layer w0.254: LED1.2 3.256,6.083 3.832,6.658 v1(3.832,6.69)
TS: pad.18 R5.1 R7.2 U2.7 | length 2.7
  Top Layer w0.229: v1(5.645,4.801) 5.645,4.876 5.858,5.089 5.858,5.529 U2.7
  Bottom Layer w0.229: R5.1 4.559,5.582 4.693,5.448 R7.2 5.612,5.386 5.612,4.833 v1(5.645,4.801)
VBUS: C1.2 C5.2 F1.1 U1.2 U2.1 | length 5.8
  Top Layer w0.381: 0.578,4.299 0.578,5.277 0.8,5.499 3.371,5.499 3.721,5.149 3.721,4.902 C1.2@3.886,4.737 ; C1.2@3.912,4.699 4.092,4.519 U1.2
  other v1: 1.041,0.876 0.597,5.537 0.546,7.315 0.546,7.938
VBUS#: D1.2 F1.2 J1.A4 J1.A9 J1.B4 J1.B9 | length 9.4
  Top Layer w0.381: v1(7.879,0.699) 7.87,0.708 7.87,1.578 7.785,1.663 7.785,2.083 8.156,2.453 8.156,3.854 v1(8.169,3.868)
  Top Layer w0.508: D1.2 v1(7.879,0.699)
  Bottom Layer w0.381: v1(3.759,0.546) 3.785,0.572 J1.B4 3.801,1.781 3.801,2.42 4.169,2.789 4.169,3.35 J1.A9 ; J1.B9@7.757,1.362 J1.B9@7.785,1.333 ; J1.B9@7.83,1.289 J1.B9@7.785,1.333 ; v1(7.879,0.699) 7.879,0.704 7.785,0.798 J1.B9@7.785,1.333 ; J1.A4 8.141,3.321 8.141,2.642 7.899,2.4 7.899,1.88 J1.B9 J1.B9@7.785,1.333
  other v1: 2.654,0.648
VSET_FB: C2.1 R4.2 R8.1 U2.9 | length 0.8
  Top Layer w0.152: R8.1@8.103,6.184 8.172,6.115 8.172,5.455
pads on no net: J1.0# J1.1# J1.A8 J1.B8 U2.5

## Polygon pours and split planes (outlines as drawn)
GND on Bottom Layer "GND_L02_P000" (solid, pour order 0): 0,0 0,18 12,18 12,0

## Other copper
Top Layer:
  rectangle net VSET_FB: 6.706,5.956 8.42,6.375
  rectangle net BAT: 8.865,4.775 11.252,17.64
  rectangle net GND: 0.635,13.399 5.524,17.628
  rectangle net GND: 1.372,5.791 2.464,7.341
  rectangle net GND: 0.635,8.7 2.794,10.325
  rectangle net GND: 0.635,10.236 4.801,17.628
  rectangle net BAT: 6.667,13.449 11.112,17.64
  rectangle net VBUS: 0.165,0.305 1.499,1.435
  rectangle net VBUS: 0.165,0.305 0.991,8.293
  rectangle net VBUS#: 7.95,2.705 8.445,4.153
  rectangle net VBUS#: 7.569,0.356 8.09,2.388
  rectangle net GND: 8.623,0.292 9.423,4.153
  rectangle net GND: 1.753,8.7 2.794,9.22
  rectangle net VSET_FB: 7.925,4.547 8.42,6.363
  rectangle net VBUS#: 2.184,0.254 8.115,0.864
  rectangle net VBUS: 0.165,7.531 1.435,8.28
  rectangle net VSET_FB: 7.175,4.432 8.42,5.067
  rectangle net FB_GND: 6.248,4.547 6.553,5.842
  rectangle net VBUS: 2.946,7.48 4.508,7.836
  rectangle net VBUS: 1.092,7.531 3.531,8.28
  rectangle net NetC7_2: 3.124,8.433 4.559,10.008
  rectangle net GND: 6.35,7.023 8.534,7.81
  rectangle net IND_SW: 5.863,8.039 6.629,8.661
  rectangle net IND_SW: 5.982,8.026 7.226,9.881
  rectangle net NetC7_2: 3.696,8.039 4.648,10.008
  rectangle net NetC7_2: 3.912,8.039 4.991,8.636
  rectangle net IND_SW: 4.978,9.868 6.794,10.579
  region net BAT: 8.56,8.865 11.125,8.865 11.125,16.423 7.888,16.423 ccw(c7.888,15.439) 6.94,15.173 ccw(c8.366,14.979) 8.56,13.553
  region net REGN: 2.972,7.341 4.521,7.341 4.521,7.023 2.972,7.023
  region net NetC6_1: 4.991,9.449 4.991,8.928 5.664,8.928 5.664,9.449
Bottom Layer:
  rectangle net VBUS: 0.152,0.318 0.991,8.306
  rectangle net VBUS: 0.152,0.292 1.511,1.448
  rectangle net GND: 2.807,1.206 3.289,3.924
  rectangle net VBUS#: 3.531,0.356 3.912,2.324
  rectangle net VBUS#: 3.95,2.781 4.407,3.988
  rectangle net VBUS#: 7.95,2.718 8.445,3.95
  rectangle net VBUS#: 7.569,0.203 8.09,2.375
  rectangle net GND: 8.407,0.381 9.233,2.311
  rectangle net GND: 8.674,0.381 9.436,4.153
  rectangle net VBUS#: 2.083,0.203 8.09,0.864

## Silkscreen, mask and mechanical layers (free items; w line width, h text height)
Top Overlay:
  circle w0.076: c5.645,4.801 r0.305
Board Outline:
  the board outline again, w0.254

## Dimensions
0,0 to 0,18 on Mechanical 1
0,18 to 12,18 on Mechanical 1

## Text inside footprints (layer, text, board x,y; h text height)
J1: Bottom Overlay "A1" at 9.983,3.449 h0.5
J3: Bottom Overlay "-" at 0.125,14.783 h0.64 r270; Bottom Overlay "+" at 12.12,15.57 h0.64 r90